# Altium PCB ChrisByrd-IoT_Product.PcbDoc (part 5 of 6)
Units mil, origin at the board's own origin, x right, y up, seen from the top; angles counter-clockwise.
Board outline 5314.96 x 4000 mil, 2 copper layers (Top Layer, Bottom Layer), stack 57 mil thick; 306 components, 230 nets, 1006 pads, 531 vias.
Unrouted connection lines stored in the file: 476.
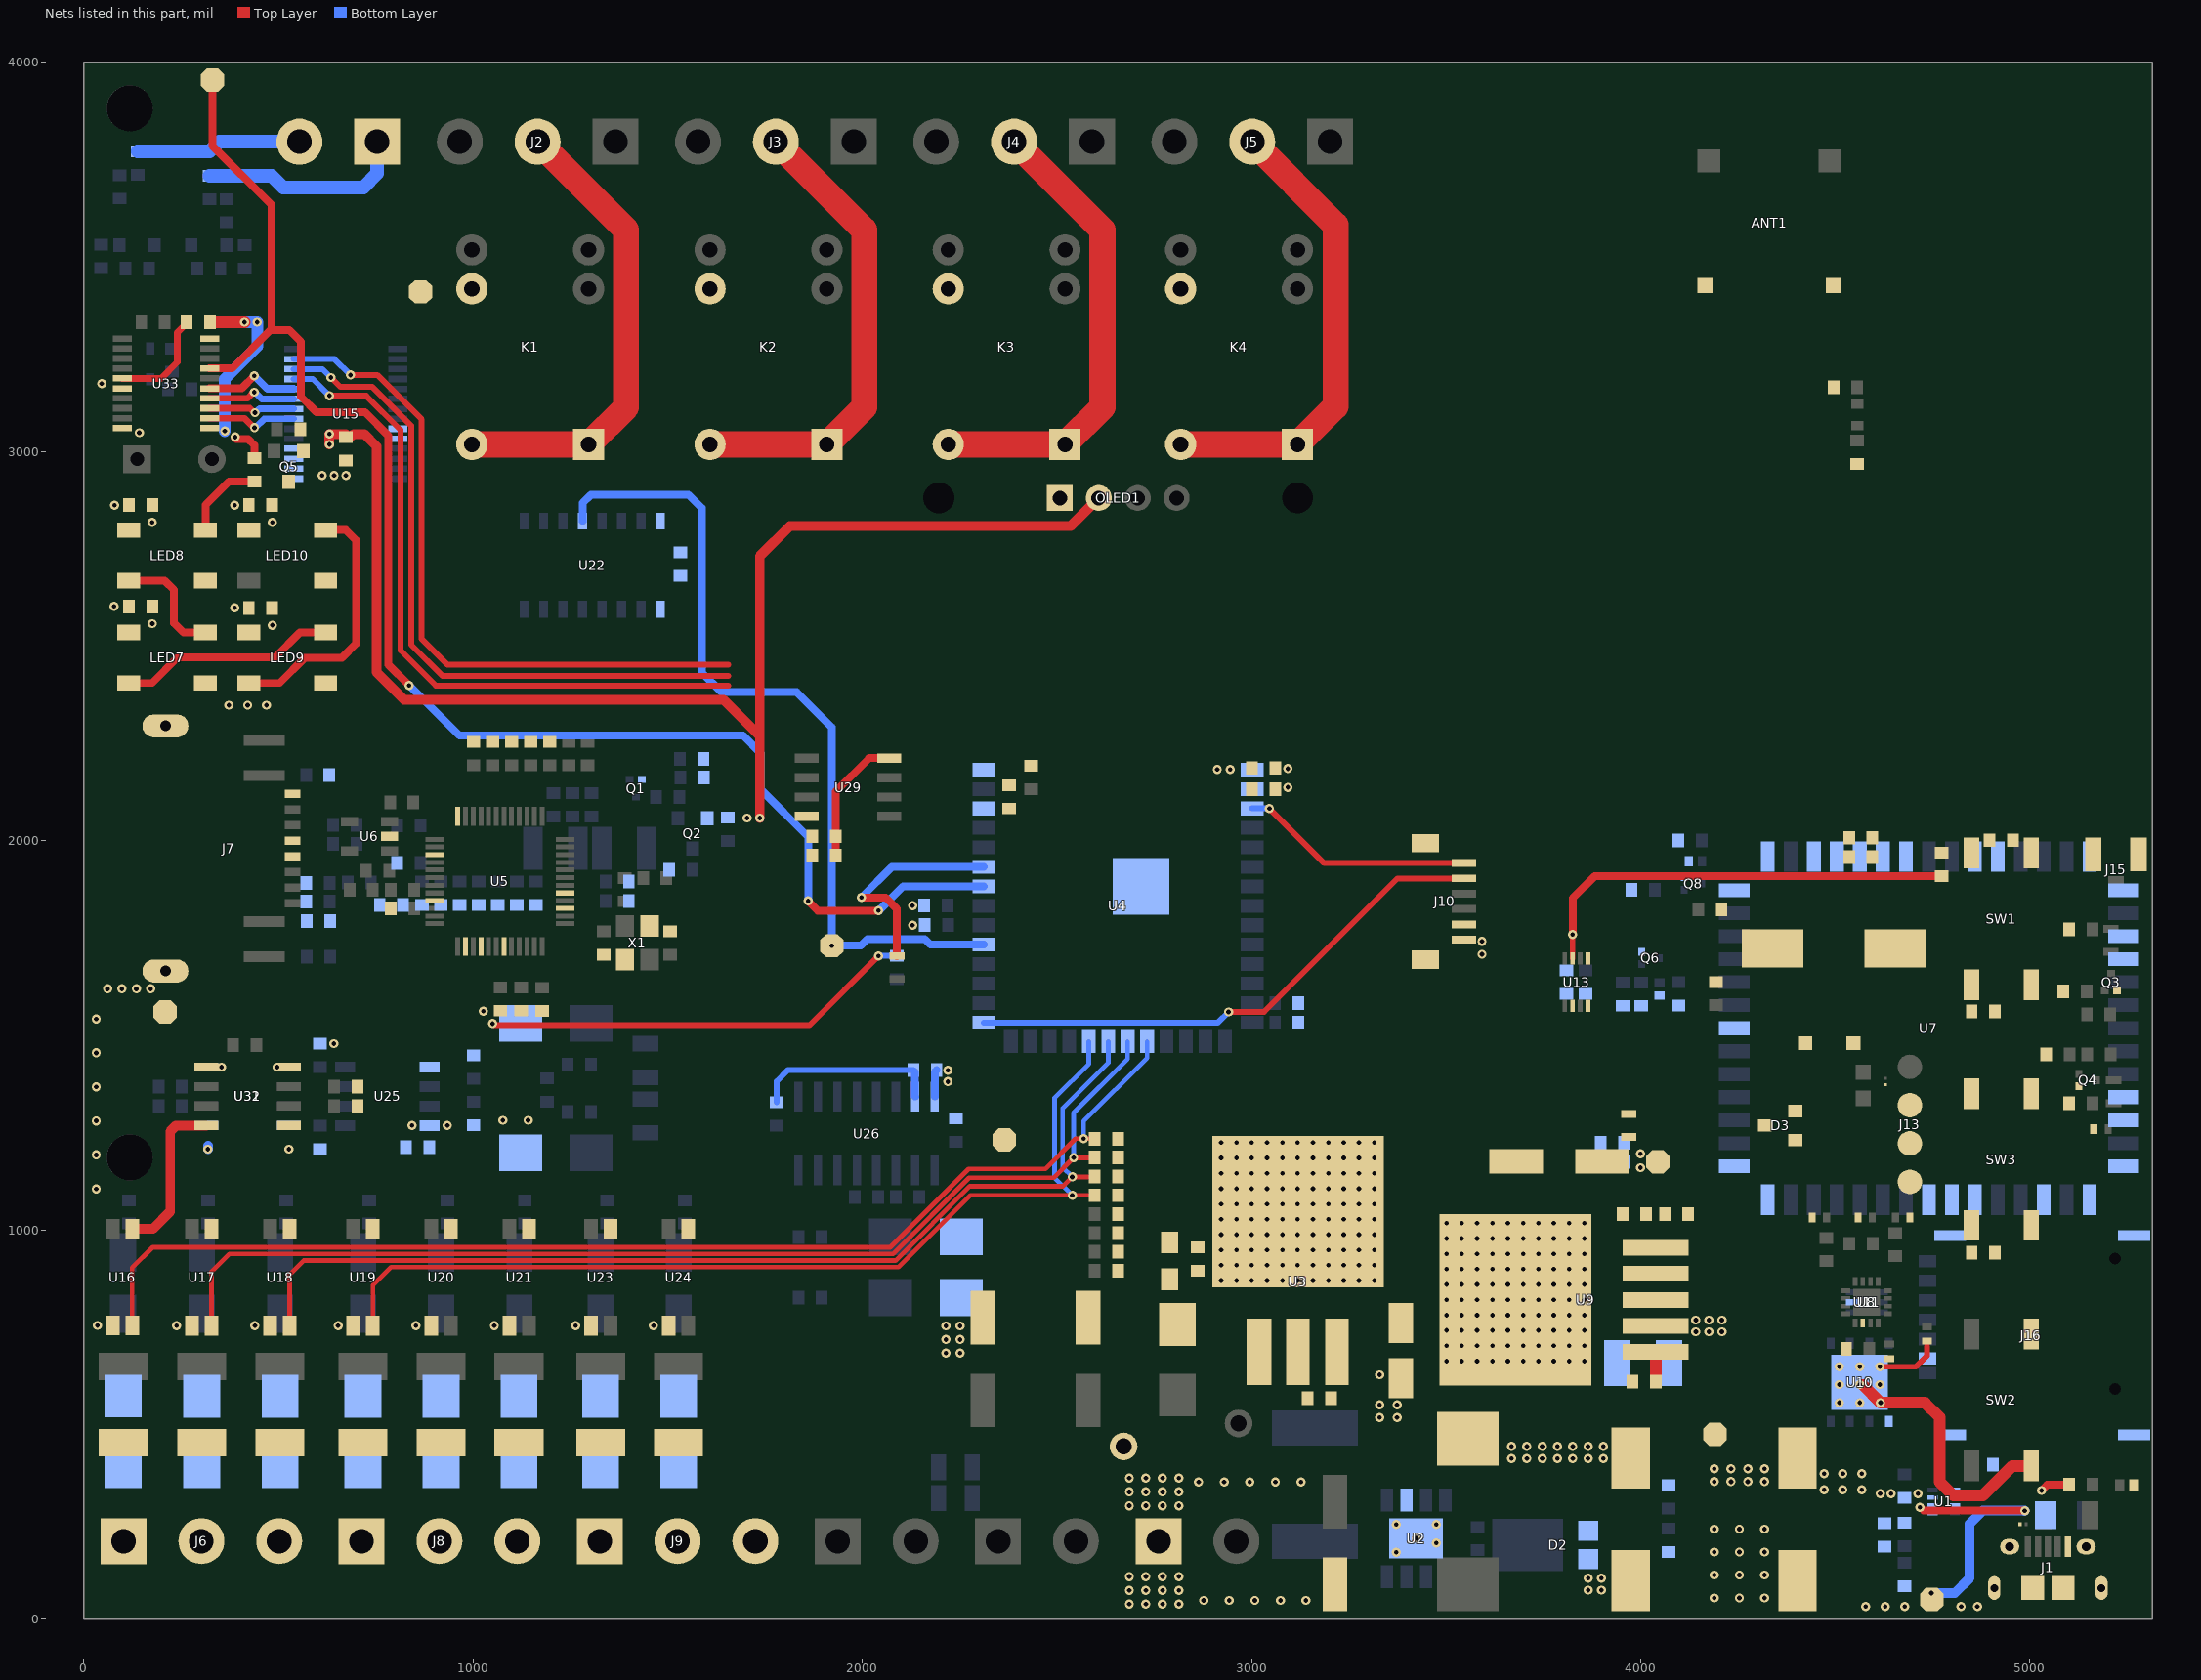
[diagram p2: the nets of this part, all layers, seen from the top]

## Part data (continued)
U13: "IC TRNSLTR BIDIRECTIONAL US8", Case/Package=VSSOP, High Level Output Current=-20uA, LCSC Part Number=C2677366, Low Level Output Current=20uA, Manufacturer="Texas Instruments", Max Operating Temperature=85°C, Max Supply Voltage=5.5V, Min Operating Temperature=-40°C, Min Supply Voltage=1.65V, Output Current=50mA, Package Quantity=1, Category="Integrated Circuits (ICs)", ComponentLink1Description=https://datasheet.ciiva.com/4226/sces641b-4226901.pdf?src-supplier=Arrow+Electronics, ComponentLink1URL=https://datasheet.ciiva.com/4226/sces641b-4226901.pdf?src-supplier=Arrow+Electronics, ComponentLink2Description=https://datasheet.ciiva.com/15096/getdatasheetpartid-226009-15096242.pdf?src-supplier=Verical, ComponentLink2URL=https://datasheet.ciiva.com/15096/getdatasheetpartid-226009-15096242.pdf?src-supplier=Verical, ComponentLink3Description=https://datasheet.ciiva.com/14287/txb0102-14287498.pdf?src-supplier=Avnet, ComponentLink3URL=https://datasheet.ciiva.com/14287/txb0102-14287498.pdf?src-supplier=Avnet, ComponentLink4Description=https://datasheet.ciiva.com/14287/txb0102-14287370.pdf?src-supplier=Avnet, ComponentLink4URL=https://datasheet.ciiva.com/14287/txb0102-14287370.pdf?src-supplier=Avnet, ComponentLink5Description=https://datasheet.ciiva.com/6619/txb0102-6619255.pdf?src-supplier=Digi-Key, ComponentLink5URL=https://datasheet.ciiva.com/6619/txb0102-6619255.pdf?src-supplier=Digi-Key, ComponentLink6Description=https://datasheet.ciiva.com/6619/txb0102-6619256.pdf?src-supplier=Digi-Key, ComponentLink6URL=https://datasheet.ciiva.com/6619/txb0102-6619256.pdf?src-supplier=Digi-Key, ComponentLink7Description=https://datasheet.ciiva.com/6619/txb0102-6619257.pdf?src-supplier=Digi-Key, ComponentLink7URL=https://datasheet.ciiva.com/6619/txb0102-6619257.pdf?src-supplier=Digi-Key, Contact Plating=Gold, Data Rate=100Mbps, Height=0.85mm, Item Type=IC, Lead Free="Lead Free", Length=2.3mm, Logic Function=Translator, Manufacturer Part Number=TXB0102DCUT, Mount="Surface Mount", Number of Bits=2, Number of Channels=2, Number of Inputs=2, Number of Pins=8, Output Type=3-STATE, Packaging="Tape and Reel", Pricing 1="1=0.79330, 10=0.66470, 25=0.65820, 250=0.37450, 500=0.36200, 1000=0.29770, 2500=0.28440 (USD)", Propagation Delay=31ns, Radiation Hardening=No, REACH SVHC="No SVHC", RoHS=Yes, RoHS Compliant=Yes, Series=-, Stock 1=10, Supplier 1="Arrow Electronics", Supplier Part Number 1=TXB0102DCUT, Turn-On Delay Time=7.4ns, Weight=0.000339oz, Width=2mm
U15: "IC XPNDR 1.7MHZ I2C 28SSOP", Case/Package=SSOP, Clock Frequency=10MHz, Frequency=1.7MHz, LCSC Part Number=C558584, Manufacturer=Microchip, Max Operating Temperature=125°C, Min Operating Temperature=-40°C, Nominal Supply Voltage=5.5V, Output Current=25mA, Package Quantity=2100, Power Dissipation=700mW, Supplier Part Number 1=MCP23017T-E/SSCT-ND, Supply Current=1mA, Category="Interface ICs", ComponentLink1Description=https://datasheet.ciiva.com/12267/21952b-12267583.pdf?src-supplier=Mouser, ComponentLink1URL=https://datasheet.ciiva.com/12267/21952b-12267583.pdf?src-supplier=Mouser, ComponentLink2Description=https://datasheet.ciiva.com/8128/21952b-8128586.pdf?src-supplier=Avnet, ComponentLink2URL=https://datasheet.ciiva.com/8128/21952b-8128586.pdf?src-supplier=Avnet, ComponentLink3Description=https://datasheet.ciiva.com/16454/filehandler-aspxddocname-en023709-16454267.pdf?src-supplier=Future+Electronics, ComponentLink3URL=https://datasheet.ciiva.com/16454/filehandler-aspxddocname-en023709-16454267.pdf?src-supplier=Future+Electronics, ComponentLink4Description=https://datasheet.ciiva.com/1780/21952b-1780738.pdf?src-supplier=Digi-Key, ComponentLink4URL=https://datasheet.ciiva.com/1780/21952b-1780738.pdf?src-supplier=Digi-Key, Interface=I2C,Serial, Item Type=IC, Lead Free="Lead Free", Manufacturer Part Number=MCP23017T-E/SS, Mounting Technology="Surface Mount", Number of Bits=16, Number of Channels=1, Number of I/Os=16, Operating Supply Voltage=5.5V, Output Type=PUSH-PULL, Packaging="Tape and Reel", Pins=28, Pricing 1="1=1.69, 25=1.4, 100=1.28 (USD)", RoHS=Yes, RoHS Compliant=Yes, Series=-, Stock 1=26314, Supplier 1=Digi-Key
U16 U17 U18 U19 U20 U21 U23 U24: "TransistorOptocouplers DC 1 2500Vrms SOP-4_P1.27 Optocouplers RoHS", LCSC Part Number=C67112, Manufacturer=RENESAS, ComponentLink1Description=LCSC, ComponentLink1URL=https://www.lcsc.com/product-detail/Optocouplers-Phototransistor-Output_RENESAS-PS2801C-1-F3-A_C67112.html, Manufacturer Part Number=PS2801C-1-F3-A
U22: "100uA@50V 3V@2V,300mA 1.6V@350mA 4mA@12V 100uA@50V 1.25V@350mA 500mA 25pF SOP-16_150mil Darlington Transistor Arrays ROHS", LCSC Part Number=C181730, Manufacturer=Mixic, Package=SOP-16_150mil, ComponentLink1Description=LCSC, ComponentLink1URL=https://www.lcsc.com/product-detail/Darlington-Transistor-Arrays_Mixic-ULN2003A_C181730.html, Item Type=IC, Manufacturer Part Number=ULN2003A
U25: "SOP-8 RS-485/RS-422 ICs ROHS", LCSC Part Number=C519086, Manufacturer=HGSEMI, Package=SOP-8, ComponentLink1Description=LCSC, ComponentLink1URL=https://www.lcsc.com/product-detail/RS-485-RS-422-ICs_HGSEMI-SP3485EIM-TR_C519086.html, Item Type=IC, Manufacturer Part Number=SP3485EIM/TR
U26: "IC TRANSCEIVER FULL 2/2 16SOIC", Case/Package=D, LCSC Part Number=C18261, Manufacturer="Texas Instruments", Max Operating Temperature=85°C, Max Supply Voltage=5.5V, Min Operating Temperature=-40°C, Min Supply Voltage=3V, Operating Supply Current=1mA, Operating Supply Voltage=5V, Package Quantity=1, Supplier Part Number 1=595-MAX3232IDR, Category="Interface ICs", ComponentLink1Description=https://datasheet.ciiva.com/8064/1882754-8064745.pdf?src-supplier=Element14, ComponentLink1URL=https://datasheet.ciiva.com/8064/1882754-8064745.pdf?src-supplier=Element14, ComponentLink2Description=https://datasheet.ciiva.com/46394/1882754-46394523.pdf?src-supplier=Element14, ComponentLink2URL=https://datasheet.ciiva.com/46394/1882754-46394523.pdf?src-supplier=Element14, ComponentLink3Description=https://datasheet.ciiva.com/46397/1882754-46397996.pdf?src-supplier=Element14, ComponentLink3URL=https://datasheet.ciiva.com/46397/1882754-46397996.pdf?src-supplier=Element14, ComponentLink4Description=https://datasheet.ciiva.com/1701/max3232-1701626.pdf?src-supplier=Digi-Key, ComponentLink4URL=https://datasheet.ciiva.com/1701/max3232-1701626.pdf?src-supplier=Digi-Key, ComponentLink5Description=https://datasheet.ciiva.com/1701/max3232-1701625.pdf?src-supplier=Digi-Key, ComponentLink5URL=https://datasheet.ciiva.com/1701/max3232-1701625.pdf?src-supplier=Digi-Key, ComponentLink6Description=https://datasheet.ciiva.com/1701/max3232-1701627.pdf?src-supplier=Digi-Key, ComponentLink6URL=https://datasheet.ciiva.com/1701/max3232-1701627.pdf?src-supplier=Digi-Key, Data Rate=250Kbps, Item Type=IC, Lead Free="Lead Free", Logic Function=Transceiver,Receiver, Manufacturer Part Number=MAX3232IDR, Mounting Technology="Surface Mount", Number of Drivers=2, Number of Receivers=2, Number of Transceivers=1, Number of Transmitters=2, Packaging="Tape and Reel", Pins=16, Pricing 1="1=2.37, 10=2.37, 50=2.37, 100=2.37, 1000=2.37, 10000=2.37 (USD)", Reach SVHC Compliant=No, Receiver Hysteresis=300mV, RoHS=Yes, RoHS Compliant=Yes, Series=-, Simplex/Duplex="Full Duplex", Stock 1=22181, Supplier 1=Mouser, Supply Current=1mA, Weight=0.004998oz
U29: "IC AUTHENTICATION CHIP 8SOIC", LCSC Part Number=C5444784, Manufacturer=Microchip, Supplier Part Number 1=2368834P, Category="Interface ICs", ComponentLink1Description=LCSC, ComponentLink1URL=https://www.lcsc.com/product-detail/Security-Verification-Encryption-ICs_Microchip-Tech-ATECC608B-SSHDA-B_C5444784.html, Item Type=IC, Manufacturer Part Number=ATECC608B-SSHDA-B, Pricing 1="20=0.758, 50=0.704, 80=0.691 (GBP)", RoHS=Yes, Stock 1=590, Supplier 1=Rs
U31: "DGTL ISO 2.5KV GEN PURP 8SOIC", Case/Package=R, Isolated Power=No, LCSC Part Number=C9669, Manufacturer="Analog Devices", Max Operating Temperature=125°C, Max Supply Current=600uA, Max Supply Voltage=5.5V, Min Operating Temperature=-40°C, Min Supply Voltage=2.7V, Output Current=35mA, Voltage=5V, Approvals=UL,CSA,VDE, Category="Interface ICs", Channel Type=Unidirectional, ComponentLink1Description=https://datasheet.ciiva.com/15119/getdatasheetpartid-121048-15119389.pdf?src-supplier=Verical, ComponentLink1URL=https://datasheet.ciiva.com/15119/getdatasheetpartid-121048-15119389.pdf?src-supplier=Verical, ComponentLink2Description=https://datasheet.ciiva.com/15367/adum1200-1201-279454-15367752.pdf?src-supplier=Mouser, ComponentLink2URL=https://datasheet.ciiva.com/15367/adum1200-1201-279454-15367752.pdf?src-supplier=Mouser, ComponentLink3Description=https://datasheet.ciiva.com/3149/adum1200-1201-3149740.pdf?src-supplier=Avnet, ComponentLink3URL=https://datasheet.ciiva.com/3149/adum1200-1201-3149740.pdf?src-supplier=Avnet, ComponentLink4Description=https://datasheet.ciiva.com/3148/adum1200-1201-3148345.pdf?src-supplier=Avnet, ComponentLink4URL=https://datasheet.ciiva.com/3148/adum1200-1201-3148345.pdf?src-supplier=Avnet, ComponentLink5Description=https://datasheet.ciiva.com/2081/adum1200-1201-2081793.pdf?src-supplier=Digi-Key, ComponentLink5URL=https://datasheet.ciiva.com/2081/adum1200-1201-2081793.pdf?src-supplier=Digi-Key, ComponentLink6Description=https://datasheet.ciiva.com/2081/adum1200-1201-2081794.pdf?src-supplier=Digi-Key, ComponentLink6URL=https://datasheet.ciiva.com/2081/adum1200-1201-2081794.pdf?src-supplier=Digi-Key, ComponentLink7Description=https://datasheet.ciiva.com/2081/adum1200-1201-2081792.pdf?src-supplier=Digi-Key, ComponentLink7URL=https://datasheet.ciiva.com/2081/adum1200-1201-2081792.pdf?src-supplier=Digi-Key, Data Rate=25Mbps, ESD Protection=No, Item Type=IC, Lead Free="Contains Lead", Manufacturer Part Number=ADUM1201ARZ-RL7, Number of Channels=2, Operating Supply Current=600uA, Packaging="Tape and Reel", Pins=8, Polarity=Bidirectional, Pricing 1="1=3.9521, 10=3.5429, 25=3.3533, 100=2.9042, 250=2.7545, 500=2.475, 1000=2.2037 (USD)", Propagation Delay=150ns, Pulse Width Distortion (PWD)=40ns, Radiation Hardening=No, RoHS=Yes, RoHS Compliant=Yes, Series=iCoupler®, Stock 1=710, Supplier 1="Arrow Electronics", Supplier Part Number 1=ADUM1201ARZ-RL7, Turn-On Delay Time=150ns, Type="General Purpose", Weight=0.019048oz
U32: "DGTL ISO 2.5KV GEN PURP 8SOIC", Case/Package=R, Isolated Power=No, LCSC Part Number=C15219, Manufacturer="Analog Devices", Max Operating Temperature=125°C, Max Supply Voltage=5.5V, Min Operating Temperature=-40°C, Min Supply Voltage=2.7V, Operating Supply Voltage=3.3V, Output Current=35mA, Package Quantity=1000, Supply Current=600uA, Category="Interface ICs", Channel Type=Unidirectional, ComponentLink1Description=https://datasheet.ciiva.com/15119/getdatasheetpartid-258305-15119482.pdf?src-supplier=Verical, ComponentLink1URL=https://datasheet.ciiva.com/15119/getdatasheetpartid-258305-15119482.pdf?src-supplier=Verical, ComponentLink2Description=https://datasheet.ciiva.com/30514/1805054-30514023.pdf?src-supplier=Jameco, ComponentLink2URL=https://datasheet.ciiva.com/30514/1805054-30514023.pdf?src-supplier=Jameco, ComponentLink3Description=https://datasheet.ciiva.com/3148/adum1200-1201-3148342.pdf?src-supplier=Avnet, ComponentLink3URL=https://datasheet.ciiva.com/3148/adum1200-1201-3148342.pdf?src-supplier=Avnet, ComponentLink4Description=https://datasheet.ciiva.com/2081/adum1200-1201-2081796.pdf?src-supplier=Digi-Key, ComponentLink4URL=https://datasheet.ciiva.com/2081/adum1200-1201-2081796.pdf?src-supplier=Digi-Key, ComponentLink5Description=https://datasheet.ciiva.com/2081/adum1200-1201-2081797.pdf?src-supplier=Digi-Key, ComponentLink5URL=https://datasheet.ciiva.com/2081/adum1200-1201-2081797.pdf?src-supplier=Digi-Key, ComponentLink6Description=https://datasheet.ciiva.com/2081/adum1200-1201-2081795.pdf?src-supplier=Digi-Key, ComponentLink6URL=https://datasheet.ciiva.com/2081/adum1200-1201-2081795.pdf?src-supplier=Digi-Key, Data Rate=25Mbps, Item Type=IC, Lead Free="Contains Lead", Manufacturer Part Number=ADUM1200ARZ-RL7, Number of Channels=2, Packaging="Tape and Reel", Pins=8, Pricing 1="1=3.887, 10=3.493, 25=3.295, 100=2.865, 250=2.706, 500=2.425, 1000=2.066, 3000=2.048, 6000=2.025 (USD)", Propagation Delay=150ns, Pulse Width Distortion (PWD)=40ns, Radiation Hardening=No, RoHS=Yes, RoHS Compliant=Yes, Series=iCoupler®, Stock 1=14777, Supplier 1="Arrow Electronics", Supplier Part Number 1=ADUM1200ARZ-RL7, Turn-On Delay Time=150ns, Type="General Purpose"
U33: "IC TELECOM INTERFACE 20SSOP", Case/Package=SSOP, Frequency=3.58MHz, LCSC Part Number=C1522106, Manufacturer=Microsemi, Max Operating Temperature=85°C, Max Power Dissipation=500mW, Max Supply Voltage=5.25V, Min Operating Temperature=-40°C, Min Supply Voltage=4.75V, Operating Supply Current=3mA, Operating Supply Voltage=5V, Package Quantity=660, Supplier Part Number 1=03AH2719, Category=Uncategorized, ComponentLink1Description=https://datasheet.ciiva.com/29641/mt8870d-datasheet-oct2006-29641321.pdf?src-supplier=Digi-Key, ComponentLink1URL=https://datasheet.ciiva.com/29641/mt8870d-datasheet-oct2006-29641321.pdf?src-supplier=Digi-Key, Item Type=IC, Logic Function=Receiver, Manufacturer Part Number=MT8870DN1, Mounting Technology="Surface Mount", Number of Circuits=1, Packaging=Rail/Tube, Pins=20, Radiation Hardening=No, RoHS=No, RoHS Compliant=No, Supplier 1=Newark, Weight=0.016oz
X1: library part NX3225GA-25MHZ-STD-CRG-2, "SMD3225-4P Crystals ROHS", LCSC Part Number=C438901, Manufacturer=NDK, Package=SMD3225-4P, ComponentLink1Description=LCSC, ComponentLink1URL=https://www.lcsc.com/product-detail/Crystals_NDK-NX3225GA-25MHZ-STD-CRG-2_C438901.html, Item Type=Crystal, Manufacturer Part Number=NX3225GA-25MHZ-STD-CRG-2
X2: library part X49SD3579545MSD2SC-1, "3.579545MHz 20pF ±20ppm ±30ppm HC-49S Crystals ROHS", LCSC Part Number=C2195, Manufacturer="Yangxing Tech", Package=HC-49S, ComponentLink1Description=LCSC, ComponentLink1URL=https://www.lcsc.com/product-detail/Crystals_Yangxing-Tech-X49SD3579545MSD2SC-1_C2195.html, Item Type=Crystal, Manufacturer Part Number=X49SD3579545MSD2SC-1

## Free pads (board coordinates)
  round 118.11 hole 118.11 unplated mask+1.97: MH(118.11,1186) MH(118.11,3881.89)

## Via types
v1: diameter 23.62, hole 11.81, Top Layer to Bottom Layer, 531 vias

## Nets (pads, with @x,y where several pads share a name; then routed paths per layer and width w, separated by ;. In a path a pad name is that pad's centre, name@x,y a point inside that pad or via, vN(x,y) a via of type N, cw(c..) or ccw(c..) an arc to the next point about the centre after c; other vN are vias at no path point)
3V3: C9.2 C10.1 C19.2 C46.2 C47.2 C57.1 C58.2 C68.1 C69.1 C70.1 C71.1 J10.1 OLED1.2 P4.1 Q2.2 Q5.1 R7.2 R8.2 R49.2 R62.2 R63.2 R71.1 R78.1 R79.1 R87.1 R88.1 R89.1 R90.2 R91.2 R93.1 R94.1 R95.1 R96.1 R97.1 R98.1 R104.2 R110.1 U3.2 U3.4 U4.2 U13.7 U15.9 U15.18 U16.1 U17.1 U18.1 U19.1 U20.1 U21.1 U23.1 U24.1 U25.8 U26.16 U29.8 U31.1 U31.8 U32.1 U32.8 | length 5028.8
  Top Layer w13: U13.7@3824.83,1697.26 3824.92,1697.34 3824.92,1758.92 v1(3825,1759)
  Top Layer w20: v1(3825,1759) 3825,1852 3881.69,1908.69 R49.2@4773.32,1908.69
  Top Layer w25: U16.1@124.4,1002.3 177.17,1002.3 222,1047.13 222,1252.99 237,1268 U32.8@314.64,1268 ; v1(631,3018) v1(631,3045) C57.1@673.32,3045 ; C57.1@673.32,3039.62 687.59,3039.62 692.97,3045 720.78,3045 752.32,3013.46 752.32,2432.68 823,2362 1643.65,2362 1736.76,2268.9 ; v1(1736.76,2058) 1736.76,2268.9 ; OLED1.2@2607.48,2880.47 2535.01,2808 1813.58,2808 1736.76,2731.18 1736.76,2268.9
  Bottom Layer w20: U26.16@2186.06,1342.2 2186.89,1343.02 2186.89,1405.89 C58.2@2191,1410
  Bottom Layer w25: v1(319,1207.25) v1@319,1216.31
  other v1: 2921.78,869.52 2961.15,869.52 3000.52,869.52 3039.89,869.52 3079.26,869.52 3118.63,869.52 3158,869.52 3197.37,869.52 3236.74,869.52 3276.11,869.52 3315.48,869.52 2921.78,908.89 2961.15,908.89 3000.52,908.89 3039.89,908.89 3079.26,908.89 3118.63,908.89 3158,908.89 3197.37,908.89 3236.74,908.89 3276.11,908.89 3315.48,908.89 2921.78,948.26 2961.15,948.26 3000.52,948.26 3039.89,948.26 3079.26,948.26 3118.63,948.26 3158,948.26 3197.37,948.26 3236.74,948.26 3276.11,948.26 3315.48,948.26 2921.78,987.63 2961.15,987.63 3000.52,987.63 3039.89,987.63 3079.26,987.63 3118.63,987.63 3158,987.63 3197.37,987.63 3236.74,987.63 3276.11,987.63 3315.48,987.63 2921.78,1027 2961.15,1027 3000.52,1027 3039.89,1027 3079.26,1027 3118.63,1027 3158,1027 3197.37,1027 3236.74,1027 3276.11,1027 3315.48,1027 2921.78,1066.37 2961.15,1066.37 3000.52,1066.37 3039.89,1066.37 3079.26,1066.37 3118.63,1066.37 3158,1066.37 3197.37,1066.37 3236.74,1066.37 3276.11,1066.37 3315.48,1066.37 2921.78,1105.74 2961.15,1105.74 3000.52,1105.74 3039.89,1105.74 3079.26,1105.74 3118.63,1105.74 3158,1105.74 3197.37,1105.74 3236.74,1105.74 3276.11,1105.74 3315.48,1105.74 2921.78,1145.11 2961.15,1145.11 3000.52,1145.11 3039.89,1145.11 3079.26,1145.11 3118.63,1145.11 3158,1145.11 3197.37,1145.11 3236.74,1145.11 3276.11,1145.11 3315.48,1145.11 2921.78,1184.48 2961.15,1184.48 3000.52,1184.48 3039.89,1184.48 3079.26,1184.48 3118.63,1184.48 3158,1184.48 3197.37,1184.48 3236.74,1184.48 3276.11,1184.48 3315.48,1184.48 527.23,1207.25 2921.78,1223.85 2961.15,1223.85 3000.52,1223.85 3039.89,1223.85 3079.26,1223.85 3118.63,1223.85 3158,1223.85 3197.37,1223.85 3236.74,1223.85 3276.11,1223.85 3315.48,1223.85 843,1268 934,1268 2219.81,1380.58 2219.81,1410.01 642.61,1478.38 3592,1708 3592,1741 2129,1783 2129,1833 1704.03,2058 3093,2137 3093,2185
5V: C4.1 C6.1 C11.1 C12.2 C54.1 C65.1 C66.1 C67.1 C72.1 C73.1 K1.5 K2.5 K3.5 K4.5 LED7.1 LED8.1 LED9.1 LED10.1 P3.1 R1.2 R4.1 R111.1 U1.2 U1.7 U3.3 U9.2 U22.9 U33.11 U33.20 | length 604.7
  Top Layer w20: v1(388.76,3037.05) 388.76,3034.9 391.91,3031.75 422.43,3031.75 438,3016.18 R111.1@438,2983 ; v1(5029.51,329.99) 5044.22,344.7 R4.1@5100.26,344.7
  Top Layer w30: C72.1@324.23,3331.92 v1(413,3331.93)
  Bottom Layer w30: v1(362.17,3052.29) 362.17,3186.46 445.59,3269.88 v1(445.59,3331.93) v1(413,3331.93)
  other v1: 4614.97,321.99 4643.46,321.99 4712.07,321.99 3329,518 3374,518 3329,550.4 3374,550 3329,627.46 4141.54,737.89 4175,737.89 4208.46,737.89 4141.54,768 4175,768 4208.46,768 387.55,2598 77.96,2601.81 79.29,2862.12 387.65,2862.12
5V_BUCK: C52.1 C53.1 C64.1 L1.2 P1.1 R2.2 R52.2 U1.3 U1.5
  other v1: 4471,332 4519.23,332 4567.45,332 4188.86,352.83 4231.91,352.83 4274.95,352.83 4318,352.83 4471,373.69 4519.23,373.69 4567.45,373.69 4188.86,386 4231.91,386 4274.95,386 4318,386 3668,412 3707.33,412 3746.67,412 3786,412 3825.33,412 3864.67,412 3904,412 3668,444 3707.33,444 3746.67,444 3786,444 3825.33,444 3864.67,444 3904,444
5V_USB: FB1.2 P2.1 U1.6 | length 683.5
  Top Layer w20: v1(4717.03,286.97) 4718.01,286.97 4726.91,278.07 v1(4986.45,278.07)
  Bottom Layer w25: v1(4746.83,66.44) 4806.58,66.44 4845,104.85 4845,244.69 4878.38,278.07 v1(4986.45,278.07) v1@4985.6,277.22
ACTLED: R21.2 U5.27
ADJ: R5.2 R46.2 U9.5
BLE_LED: LED6.1 U4.35 | length 572.1
  Top Layer w20: v1(1997.68,1853.99) 2059.82,1853.99 2089,1824.81 LED6.1@2089,1703.53
  Bottom Layer w20: v1(1997.68,1853.99) 2076.3,1932.61 U4.35@2312.51,1932.61
CONFIGMODE: C17.2 C18.1 SW3.3 SW3.4 U4.38
CT_R: C33.2 J7.5 R18.1 R19.1
CT_T: C32.2 J7.4 R11.1
DATA_OUT1: LED7.4 LED8.2 | length 301.8
  Top Layer w20: LED8.2@115.86,2668.16 207.84,2668.16 232.03,2643.97 232.03,2559.01 256.08,2534.96 LED7.4@312.71,2534.96
DATA_OUT2: LED7.2 LED9.4 | length 559
  Top Layer w20: LED7.2@115.86,2405.04 175.35,2405.04 241.79,2471.48 491.82,2471.48 555.3,2534.96 LED9.4@621.07,2534.96
DATA_OUT3: LED9.2 LED10.4 | length 672.2
  Top Layer w20: LED9.2@424.22,2405.04 502.96,2405.04 567.92,2470 663.12,2470 699.64,2506.51 699.64,2771.77 673.32,2798.08 LED10.4@621.07,2798.08
DTMF+: C50.2 J18.2 | length 425.4
  Bottom Layer w35: C50.2@139,3771 322.76,3771 347.76,3796 J18.2@554,3796
DTMF-: C51.2 J18.1 | length 540.1
  Bottom Layer w35: C51.2@323,3708.61 482.24,3708.61 512.24,3678.61 718.61,3678.61 754,3714 J18.1@754,3796
DTMF_Q1: U15.21 U33.12 | length 235.7
  Top Layer w17: U33.12@323.44,3085.35 412.35,3085.35 436.81,3060.9 v1(438.6,3060.9)
  Bottom Layer w17: v1(438.6,3060.9) 440.39,3060.9 463.38,3083.89 U15.21@539.46,3083.89
DTMF_Q2: U15.22 U33.13 | length 224.8
  Top Layer w17: U33.13@323.44,3110.94 426.59,3110.94 437.97,3099.57 v1(439.76,3099.57)
  Bottom Layer w17: v1(439.76,3099.57) 441.55,3099.57 451.47,3109.49 U15.22@539.46,3109.49
DTMF_Q3: U15.23 U33.14 | length 229.8
  Top Layer w17: U33.14@323.44,3136.53 420.31,3136.53 436.18,3152.4 v1(437.97,3152.4)
  Bottom Layer w17: v1(437.97,3152.4) 439.76,3152.4 457.09,3135.08 U15.23@539.46,3135.08
DTMF_Q4: U15.24 U33.15 | length 243.5
  Top Layer w20: U33.15@323.44,3162.13 405.57,3162.13 v1(437.97,3194.52)
  Bottom Layer w20: v1(437.97,3194.52) 471.83,3160.67 U15.24@539.46,3160.67
DTMF_STD: P7.1 U4.34 U33.17 | length 3958.3
  Top Layer w20: U33.17@323.44,3213.31 381.23,3213.31 479.5,3311.58 ; P7.1@330.82,3954.02 330.82,3785.03 482.24,3633.61 482.24,3314.32 479.5,3311.58 ; v1(836,2399) 782.57,2452.43 782.57,3040.98 722.54,3101.02 597.77,3101.02 558.21,3140.57 558.21,3281.49 528.12,3311.58 479.5,3311.58 ; v1(1861,1845) 1886,1820 v1(2042,1820)
  Bottom Layer w20: v1(836,2399) 965,2270 1694,2270 1738.74,2225.26 1738.74,2131.84 1861,2009.57 v1(1861,1845) ; v1(2042,1820) 2104.61,1882.61 U4.34@2312.51,1882.61
EN: C13.2 C14.1 J10.6 R49.1 SW1.3 SW1.4 U4.3 | length 602.3
  Top Layer w15: v1(3046.01,2082.61) 3186.19,1942.43 J10.6@3545.7,1942.43
  Bottom Layer w15: U4.3@3001.49,2082.61 v1(3046.01,2082.61)
FAULT: P8.1 U4.31 U22.4 | length 2155.8
  Bottom Layer w20: U22.4@1281.32,2820.88 1281.32,2867.32 1303,2889 1553.32,2889 1587.61,2854.7 1587.61,2432.22 1637.91,2381.92 1831.08,2381.92 1922,2291 v1(1922,1730) 1996,1730 2013,1747 2160.61,1747 2175,1732.61 U4.31@2312.51,1732.61
GND: "J7.Shield 1" "J7.Shield 2" ANT1.2 C1.1 C2.2 C4.2 C5.2 C6.2 C7.2 C8.2 C9.1 C10.2 C11.2 C12.1 C13.1 C14.2 C15.1 C16.2 C17.1 C18.2 C20.1 C21.1 C22.1 C23.1 C24.1 C25.1 C26.1 C27.1 C28.1 C29.1 C32.1 C33.1 C34.1 C35.1 C36.1 C37.1 C38.1 C39.2 C40.2 C41.1 C42.1 C43.1 C44.1 C45.1 C46.1 C47.1 C52.2 C53.2 C54.2 C55.1 C56.1 C57.2 C58.1 C61.2 C62.2 C63.1 C64.2 C65.2 C66.2 C67.2 C68.2 C69.2 C70.2 C71.2 C72.2 C73.2 C74.1 D1.2 D2.1 D2.3 D3.3 D4.1 D6.1 D7.1 D8.1 D11.1 D12.1 D13.1 D15.1 D17.1 D18.1 D19.2 D21.1 D23.1 D25.1 D27.1 D29.1 D31.1 J1.5 J1.MH1 J1.MH2 J1.MH3 J1.MH4 J1.MP1 J1.MP2 J7.8 J9.3 J10.2 J10.MP1 J10.MP2 J12.1 J13.4 J15.2 J15.3 J16.1 J16.2 J16.3 J16.4 J16.C5 LED1.2 LED5.2 LED7.3 LED8.3 LED9.3 LED10.3 OLED1.1 P6.1 Q1.2 Q3.2 Q4.2 Q6.2 Q8.2 R3.1 R27.1 R28.1 R29.1 R30.1 R31.1 R32.1 R33.1 R34.1 R42.1 R45.1 R46.1 R48.1 R51.1 R53.1 R54.1 R66.2 R92.1 R99.1 R112.2 SW1.1 SW1.2 SW2.1 SW2.2 SW3.1 SW3.2 U1.1 U2.6 U2.9 U3.1 U4.1 U4.40 U4.41 U5.3 U5.9 U5.14 U5.16 U5.19 U5.29 U5.48 U6.2 U7.1 U7.3 U7.6 U7.15 U7.16 U7.22 U7.28 U7.29 U7.31 U7.32 U7.35 U7.43 U7.44 U7.46 U7.47 U7.53 U7.54 U7.56 U8.2 U9.3 U9.6 U10.1 U10.9 U11.6 U13.2 U15.10 U15.15 U15.16 U15.17 U16.3 U17.3 U18.3 U19.3 U20.3 U21.3 U22.8 U23.3 U24.3 U25.5 U26.15 U29.4 U31.4 U31.5 U32.4 U32.5 U33.5 U33.6 U33.10 X1.2 X1.4 | length 3060.4
  Top Layer w15: v1(1050.51,1530) 1054.51,1526 1864.47,1526 v1(2042,1703.53) ; v1(4614.49,648.19) 4706.89,648.19 4735.66,676.96 C74.1@4735.66,713.99
  Top Layer w17: U33.5@99.03,3187.72 198.44,3187.72 240.3,3229.57 240.3,3305.5 264.23,3329.42 C72.2@264.23,3331.92
  Top Layer w20: C71.2@1932,1961 C70.2@1932,2011 1932,2126.33 2017.67,2212 U29.4@2069.6,2212
  Top Layer w30: v1@4570.27,601.7 4616.12,555.84 4730.16,555.84 4767.44,518.56 4767.44,352.56 4802.56,317.44 4879,317.44 4954.85,393.29 SW2.2@5003.16,393.29 ; v1(4615.93,555.84) v1@4617.09,557
  Bottom Layer w15: C61.2@1780,1328 1780,1381.51 1808.49,1410 C58.1@2131,1410 C58.1@2135.23,1405.77 ; v1(2042,1703.53) 2042.24,1703.76 2088.76,1703.76 R92.1@2089,1704
  Bottom Layer w20: C58.1@2135.23,1405.77 2135.23,1343.02 U26.15@2136.06,1342.2
  other v1: 4578,32 4627.95,32 4677.9,32 4823,32 4864.71,32 2686,38 2728.58,38 2771.16,38 2813.74,38 2877,47.77 2942.75,47.77 3008.5,47.77 3074.25,47.77 3140,47.77 4188.86,54 4253.43,54 4318,54 2686,73.5 2728.58,73.5 2771.16,73.5 2813.74,73.5 3864.76,74 3899,74 3864.76,105 3899,105 2686,109 2728.58,109 2771.16,109 2813.74,109 4188.86,112.98 4253.43,112.98 4318,112.98 3372,171 4188.86,171.96 4253.43,171.96 4318,171.96 3474.42,195 3423,207 4188.86,230.94 4253.43,230.94 4318,230.94 3372,243 3474.42,242.84 2686,291 2728.58,291 2771.16,291 2813.74,291 2686,326.5 2728.58,326.5 2771.16,326.5 2813.74,326.5 2864,352 2929.75,352 2995.5,352 3061.25,352 3127,352 2686,362 2728.58,362 2771.16,362 2813.74,362 4510,555.84 4562.65,555.84 4510,602.36 4562.65,602.36 4614.49,602.36 4510,648.19 4562.65,648.19 3500.95,662.71 3540.32,662.71 3579.69,662.71 3619.06,662.71 3658.43,662.71 3697.8,662.71 3737.17,662.71 3776.54,662.71 3815.91,662.71 3855.28,662.71 2214.51,683 2250.92,683 3500.95,702.08 3540.32,702.08 3579.69,702.08 3619.06,702.08 3658.43,702.08 3697.8,702.08 3737.17,702.08 3776.54,702.08 3815.91,702.08 3855.28,702.08 2214.51,718.03 2250.92,718.03 3500.95,741.45 3540.32,741.45 3579.69,741.45 3619.06,741.45 3658.43,741.45 3697.8,741.45 3737.17,741.45 3776.54,741.45 3815.91,741.45 3855.28,741.45 2214.51,753.06 2250.92,753.06 35,754.27 238.6,753.97 439.6,753.97 653.28,753.97 853.6,753.97 1054.6,753.97 1263.6,753.97 1463.6,753.97 3500.95,780.82 3540.32,780.82 3579.69,780.82 3619.06,780.82 3658.43,780.82 3697.8,780.82 3737.17,780.82 3776.54,780.82 3815.91,780.82 3855.28,780.82 3500.95,820.19 3540.32,820.19 3579.69,820.19 3619.06,820.19 3658.43,820.19 3697.8,820.19 3737.17,820.19 3776.54,820.19 3815.91,820.19 3855.28,820.19 3500.95,859.56 3540.32,859.56 3579.69,859.56 3619.06,859.56 3658.43,859.56 3697.8,859.56 3737.17,859.56 3776.54,859.56 3815.91,859.56 3855.28,859.56 3500.95,898.93 3540.32,898.93 3579.69,898.93 3619.06,898.93 3658.43,898.93 3697.8,898.93 3737.17,898.93 3776.54,898.93 3815.91,898.93 3855.28,898.93 3500.95,938.3 3540.32,938.3 3579.69,938.3 3619.06,938.3 3658.43,938.3 3697.8,938.3 3737.17,938.3 3776.54,938.3 3815.91,938.3 3855.28,938.3 3500.95,977.67 3540.32,977.67 3579.69,977.67 3619.06,977.67 3658.43,977.67 3697.8,977.67 3737.17,977.67 3776.54,977.67 3815.91,977.67 3855.28,977.67 3500.95,1017.04 3540.32,1017.04 3579.69,1017.04 3619.06,1017.04 3658.43,1017.04 3697.8,1017.04 3737.17,1017.04 3776.54,1017.04 3815.91,1017.04 3855.28,1017.04 32,1105 32,1192.4 32,1279.8 1076.28,1281.24 1141.42,1281.24 32,1367.2 354,1418 496.72,1418 32,1454.6 32,1542 1026.51,1561.49 61,1619 98,1619 135,1619 172,1619 2912,2182.61 2945,2182.61 372.71,2348 420.92,2348 469.13,2348 484.13,2553.65 176.04,2557.47 175.86,2817.77 484.13,2817.77 612,2938.62 643,2938.62 673.32,2938.62 142.52,3048.26 45.94,3174.27
GNSS_ANT: ANT1.1 C49.2 SB1.2
GSM_BUCK_EN: R54.2 U9.1 U15.27 | length 1848.9
  Top Layer w15: v1(684.75,3196.46) 754.06,3196.46 868,3082.52 868,2518.06 933.64,2452.43 1656,2452.43
  Top Layer w30: U9.1@4038.32,686.18 4039,685.5 R54.2@4039,609.96
  Bottom Layer w15: U15.27@539.46,3237.44 643.78,3237.44 v1(684.75,3196.46)
GSM_PROG.GSM_USB_D_N: D3.2 J13.2 U7.7
GSM_PROG.GSM_USB_D_P: D3.1 J13.3 U7.8
GSM_PWR: C1.2 C2.1 C38.2 C39.1 C40.1 D6.2 LED5.1 P5.1 R5.1 R34.2 R40.1 R43.1 R64.2 U7.33 U7.34 U9.4
  other v1: 3998.99,1159.47 3998.99,1195.47
GSM_PWR_EN: R50.1 U15.26 | length 1772.7
  Top Layer w15: v1(634.71,3189.97) 635.3,3189.97 659.27,3166 741.41,3166 841.02,3066.39 841.02,2503.66 921.21,2423.47 1656,2423.47
  Bottom Layer w15: U15.26@539.46,3211.85 612.83,3211.85 v1(634.71,3189.97)
GSM_RST: R47.1 U15.25 | length 1774.6
  Top Layer w15: v1(631,3143.34) 725.66,3143.34 813.81,3055.19 813.81,2488.98 904.55,2398.24 1656,2398.24
  Bottom Layer w15: U15.25@539.46,3186.26 588.09,3186.26 v1(631,3143.34)
GSM_RX: U7.39 U13.4
GSM_TX: U7.38 U13.5
HV_LED_DATA: LED8.4 Q5.3 R111.2 | length 215.1
  Top Layer w20: LED8.4@312.71,2798.08 312.71,2863 372.71,2923 R111.2@438,2923
IN_1: J2.2 K1.1 K1.6 | length 1211.8
  Top Layer w66.93: K1.6@997,3018 K1.1@1297,3018 1393,3114 1393,3569 J2.2@1166,3796
IN_2: J3.2 K2.1 K2.6 | length 1211.8
  Top Layer w66.93: K2.6@1609,3018 K2.1@1909,3018 2005,3114 2005,3569 J3.2@1778,3796
IN_3: J4.2 K3.1 K3.6 | length 1211.8
  Top Layer w66.93: K3.6@2221,3018 K3.1@2521,3018 2617,3114 2617,3569 J4.2@2390,3796
IN_4: J5.2 K4.1 K4.6 | length 1207.2
  Top Layer w66.93: K4.6@2818,3018 K4.1@3118,3018 3216,3116 3216,3582 J5.2@3002,3796
INPUT_1: D15.2 F2.2 J6.1
INPUT_2: D17.2 F3.2 J6.2
INPUT_3: D21.2 F6.2 J6.3
INPUT_4: D23.2 F7.2 J8.1
INPUT_5: D25.2 F8.2 J8.2
INPUT_6: D27.2 F9.2 J8.3
INPUT_7: D29.2 F10.2 J9.1
INPUT_8: D31.2 F11.2 J9.2
IO0: J10.5 U4.27 | length 1386.6
  Top Layer w15: v1(2941,1560) 3032,1560 3375.06,1903.06 J10.5@3545.7,1903.06
  Bottom Layer w15: U4.27@2312.51,1532.61 2913.61,1532.61 v1(2941,1560)
IO1: R71.2 U4.19 U16.4 | length 3074.9
  Top Layer w12: U16.4@124.4,754.27 124.4,902.4 177,955 2071.69,955 2273.16,1156.47 2470.47,1156.47 2548,1234 v1(2569,1234) R71.2@2597,1234
  Bottom Layer w12: v1(2569,1234) 2569,1278.89 2731.8,1441.69 U4.19@2731.8,1483.39
IO2: R78.2 U4.20 U17.4 | length 2884.3
  Top Layer w12: U17.4@328,753.97 328,892 374,938 2078.73,938 2274.46,1133.73 2491.8,1133.73 v1(2543.01,1184.94) R78.2@2597.01,1184.94
  Bottom Layer w12: v1(2543.01,1184.94) 2543.01,1300.16 2681.8,1438.95 U4.20@2681.8,1483.39
IO3: R79.2 U4.21 U18.4 | length 2709
  Top Layer w12: U18.4@529,753.97 529,885 565,921 2085.77,921 2276.86,1112.08 2515.61,1112.08 v1(2539.41,1135.88) R79.2@2597.01,1135.88
  Bottom Layer w12: v1(2539.41,1135.88) 2515,1160.29 2515,1312.35 2631.8,1429.15 U4.21@2631.8,1483.39
IO4: R87.2 U4.22 U19.4 | length 2503.8
  Top Layer w12: U19.4@742.68,753.97 742.68,857.68 789,904 2092.81,904 2277.53,1088.71 v1(2539.41,1088.71) R87.2@2597.01,1088.71
  Bottom Layer w12: v1(2539.41,1088.71) 2494.01,1134.12 2494.01,1338.78 2582.01,1426.79 2582.01,1483.19 U4.22@2581.8,1483.39